# Altium PCB V_ver2.PcbDoc
Units mil, origin at the board's own origin, x right, y up, seen from the top; angles counter-clockwise.
Board outline 825 x 675 mil, 2 copper layers (Top Layer, Bottom Layer); 20 components, 10 nets, 43 pads, 6 vias.
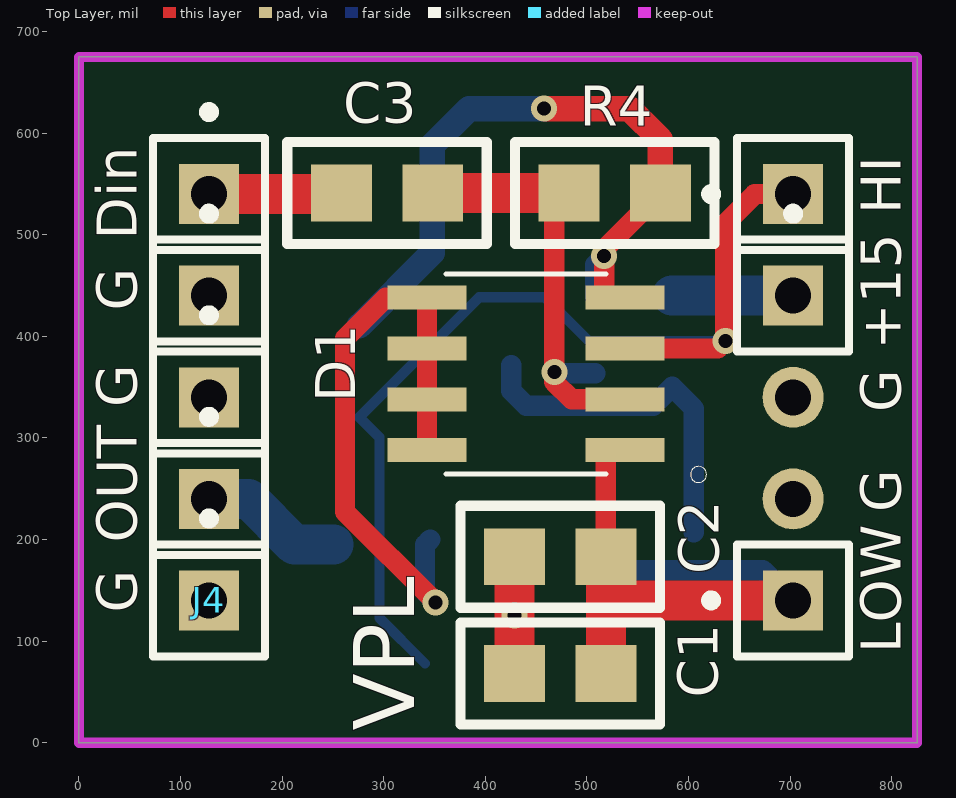
[diagram p0: Top Layer view]
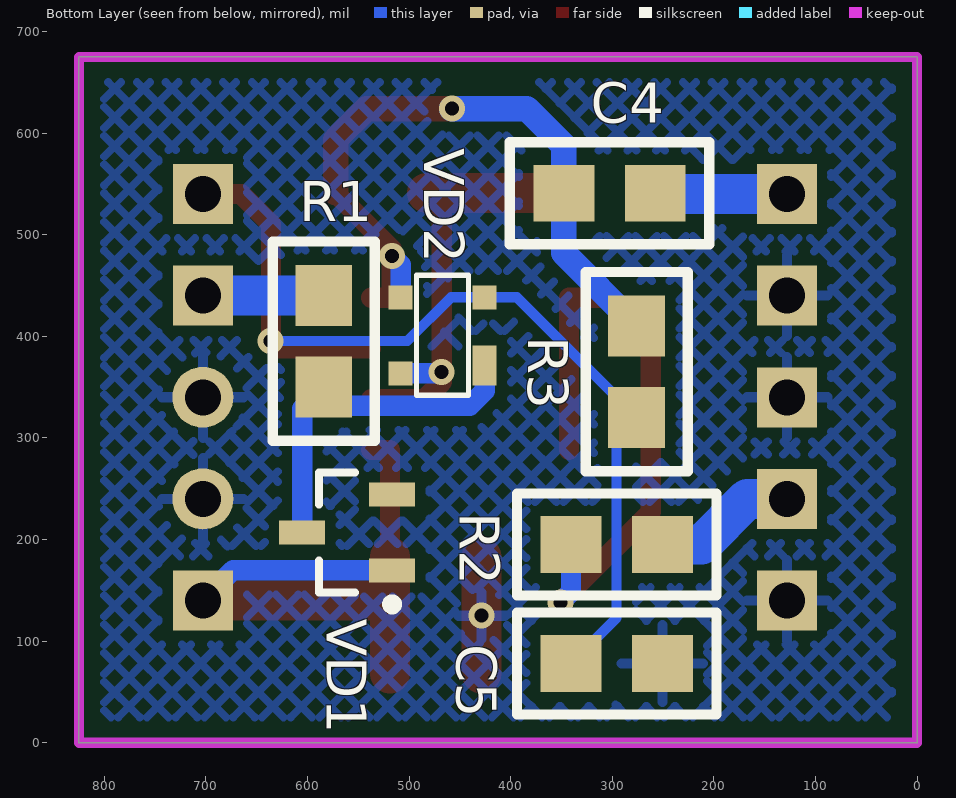
[diagram p1: Bottom Layer view, seen from below]

## Layer stack, top to bottom
Top Solder: solder mask 0.4, Solder Resist, Dk 3.5
Top Layer: signal copper 1.4
Dielectric 1: dielectric 12.6, FR-4, Dk 4.8
Bottom Layer: signal copper 1.4
Bottom Solder: solder mask 0.4, Solder Resist, Dk 3.5

## Board outline
0,0 825,0 825,675 0,675

## Design rules (kind name [scope] priority, off if disabled: settings)
Clearance [All] p1: gap=10
PolygonConnect [All] p1: connectstyle=Relief reliefconductorwidth=10 reliefentries=4 polygonreliefangle="90 Angle" airgapwidth=10
RoutingVias [All] p1: holewidth=28 width=50 viastyle="Through Hole" minholewidth=28 minwidth=50 maxholewidth=28 maxwidth=50
SolderMaskExpansion [All] p1: expansion=4
Width [All] p1: maxlimit=39.37 minlimit=10 preferedwidth=10
29 further rules are at their usual default settings.

## Classes and differential pairs
component class V_ver2: +15 C1 C2 C3 C4 C5 D1 Din G HI LOW OUT R1 R2 R3 R4 VD1 VD2

## Components (designator, comment, footprint, x,y, rotation, side; value= is the part's Value field where it differs from the comment)
+15 "" PIN1#1 703,440 r0 top
C1 "0.1" CAP_SMALL 375,18 r0 top
C2 "4.7" CAP_SMALL 375,133 r0 top
C3 "0.1" CAP_SMALL 402,591 r180 top
C4 "0.1" CAP_SMALL 401.44,490.8 r180 bottom
C5 "100.0" CAP_SMALL 197,128 r0 bottom
D1 "IRF7309" SOIC127P600X175-8N 440,363 r180 top
Din "" PIN1#1 128,540 r0 top
G "GND" PIN1#1 128,340 r0 top (schematic designator J2)
G "GND" PIN1#1 128,440 r0 top (schematic designator J3)
HI "" PIN1#1 703,540 r90 top (schematic designator V_HIGH)
J4 "GND1" PIN1#2 128,140 r0 top
LOW "" PIN1#1 703,140 r90 top (schematic designator V_LOW)
OUT "" PIN1#1 128,240 r0 top
R1 "10k" RES 535,493 r0 bottom
R2 "3" RES 198,146 r90 bottom
R3 "10k" RES 227,463 r0 bottom
R4 "100k" RES 625,492 r90 top
VD1 "MMBZ5229" SOT-23_N 561,207 r0 bottom
VD2 "HSMS2805" SOT-143B 467,401 r90 bottom

## Footprints (in the part's own frame and the unit in brackets; to place one, negate y for a bottom-side part, rotate by r counter-clockwise, add the part's x,y. Pads: shape width x height; smd on the part's side, far side on the other; paste and mask are expansions set on the pad)
CAP_SMALL [mil] "FROM_MAX"
  rect 60x55.98 smd: 1(53.71,50) 2(143.71,50)
  silkscreen extent 1,0 197,100, body extent 20,18 178,82, height 100
PIN1#1 [mm] "Connector; Plug"
  rect 1.5x1.5 hole 0.9: 1(0,0)
  silkscreen extent -1.4,-1.4 1.4,2.17
PIN1#2 [mm] "Connector; Plug"
  rect 1.5x1.5 hole 0.9: 0(0,0)
  silkscreen extent -1.4,-1.4 1.4,2.17
RES [mil] "FROM_MAX"
  rect 55.98x60 smd: 1(49,52.71) 2(49,142.71)
  silkscreen extent -1,0 99,196, body extent 17,19 81,177, height 100
SOIC127P600X175-8N [mm]
  rect 1.97x0.6 smd: 1(-2.475,1.905) 2(-2.475,0.635) 3(-2.475,-0.635) 4(-2.475,-1.905) 5(2.475,-1.905) 6(2.475,-0.635) 7(2.475,0.635) 8(2.475,1.905)
  silkscreen extent -4.51,-2.5 2,2.71
SOT-23_N [mm] "SOT23, 3-Leads, Body 2.9x1.3mm, Pitch 0.95mm, Lead Span 2.5mm, IPC Medium Density"
  rect 1.15x0.6 smd: 1(-1.125,0.95) 2(-1.125,-0.95) 3(1.125,0)
  silkscreen extent -1.25,-1.5 0.7,1.92, body extent -0.7,-1.5 0.7,1.5, height 1.1
SOT-143B [mm]
  rect 1x0.6 smd: 1(-0.75,-1.05)
  rect 0.6x0.6 smd: 2(0.95,-1.05) 3(-0.95,1.05) 4(0.95,1.05)
  silkscreen extent -1.5,-0.65 1.5,0.65

## Part data
+15 Din G G HI J4 LOW OUT: library part Socket, "Socket"
C1 C2 C3 C4 C5: library part CAP_SMALL
R1 R2 R3 R4: library part RES
VD1: library part "Diode BAS16", "Silicon Switching Diode for High-Speed Switching"
VD2: library part HSMS-2805

## Free pads (board coordinates)
  round 60 hole 35.43: 0(703,240) 0(703,340)

## Via types
v1: diameter 25.59, hole 13.78, Top Layer to Bottom Layer, 6 vias

## Nets (pads, with @x,y where several pads share a name; then routed paths per layer and width w, separated by ;. In a path a pad name is that pad's centre, name@x,y a point inside that pad or via, vN(x,y) a via of type N, cw(c..) or ccw(c..) an arc to the next point about the centre after c; other vN are vias at no path point)
GND: C1.1 C2.1 C5.1 G.1 J4.0 pad.0 | length 115
  Top Layer w39.37: C1.1 C2.1
  other v1: 428.71,125
Net+15_1: +15.1 R1.1 | length 119.1
  Bottom Layer w39.37: R1.1 702.71,440.29 +15.1
NetC1_2: C1.2 C2.2 D1.1 LOW.1 VD1.1 | length 622.4
  Top Layer w20: C2.2 518.71,288 D1.1
  Top Layer w39.37: C1.2 518.71,142 ; C2.2 518.71,142 ; LOW.1 520.71,140 518.71,142
  Bottom Layer w20: VD1.1 673.4,169.6 LOW.1
NetC3_1: C3.1 D1.2 R4.2 VD2.3 | length 443.3
  Top Layer w20: R4.2 468,526.71 v1(468,365) 468,355 485,338 D1.2
  Top Layer w39.37: C3.1 R4.2
  Bottom Layer w20: v1(468,365) 469.4,363.6 VD2.3
NetC3_2: C3.2 C4.2 Din.1 | length 260.8
  Top Layer w39.37: Din.1 257.29,540 C3.2
  Bottom Layer w39.37: Din.1 256.93,540 C4.2
NetC4_1: C4.1 D1.4 R3.1 R4.1 VD2.4 | length 701.5
  Top Layer w20: D1.4 517,438 v1(517,479) 517,485.71 R4.1
  Top Layer w25: v1@459,624 542,624 572.29,593.71 R4.1
  Bottom Layer w20: VD2.4 508.34,470.34 v1(517,479)
  Bottom Layer w25: R3.1 347.73,482.02 C4.1 347.73,587.73 384,624 v1(458,624)
NetC5_2: C5.2 D1.3 HI.1 R3.2 VD2.2 | length 992.6
  Top Layer w20: D1.3 629,388 636,395 636,511 665,540 HI.1
  Bottom Layer w10: C5.2 295.71,123 295.71,300.58 R3.2 394.11,438.4 VD2.2 458.6,438.4 501.71,395.29 v1(636.29,395.29)
NetD1_5: D1.5 D1.6 D1.7 D1.8 R2.2 | length 612.3
  Top Layer w20: D1.8 D1.7 D1.6 D1.5 302,438 262,398 262,227 v1(351,138)
  Bottom Layer w20: R2.2@345.71,200 R2.2 340.71,148.29 v1(351,138)
NetOUT_1: OUT.1 R2.1 | length 141.3
  Bottom Layer w39.37: OUT.1 167,240 212,195 R2.1
NetR1_2: R1.2 VD1.3 VD2.1 | length 349.3
  Bottom Layer w20: VD2.1 425.66,346.34 440.21,331.79 565.5,331.79 R1.2 605.29,329 VD1.3
pads on no net: VD1.2

## Polygon pours and split planes (outlines as drawn)
GND on Bottom Layer "Top Layer-No Net" (hatched 45Degree grid 20 track 8, remove dead copper, pour order 6): 25,650 25,25 800,25 800,650

## Keep-outs
Keep-Out Layer:
  the board outline again, w10

## Silkscreen, mask and mechanical layers (free items; w line width, h text height)
Top Overlay:
  text "G" at 809,325 h39.37 r90
  text "G" at 809,227 h39.37 r90
  text "G" at 57,128 h39.37 r90
  text "VPL" at 330,12 h60 r90